# Altium PCB Portable-Charger-v1.0.PcbDoc (part 3 of 3)
Units mil, origin at the board's own origin, x right, y up, seen from the top; angles counter-clockwise.
Board outline 2795.35 x 6293 mil, 2 copper layers (Top Layer, Bottom Layer), stack 57 mil thick; 75 components, 50 nets, 273 pads, 200 vias.
Unrouted connection lines stored in the file: 2.
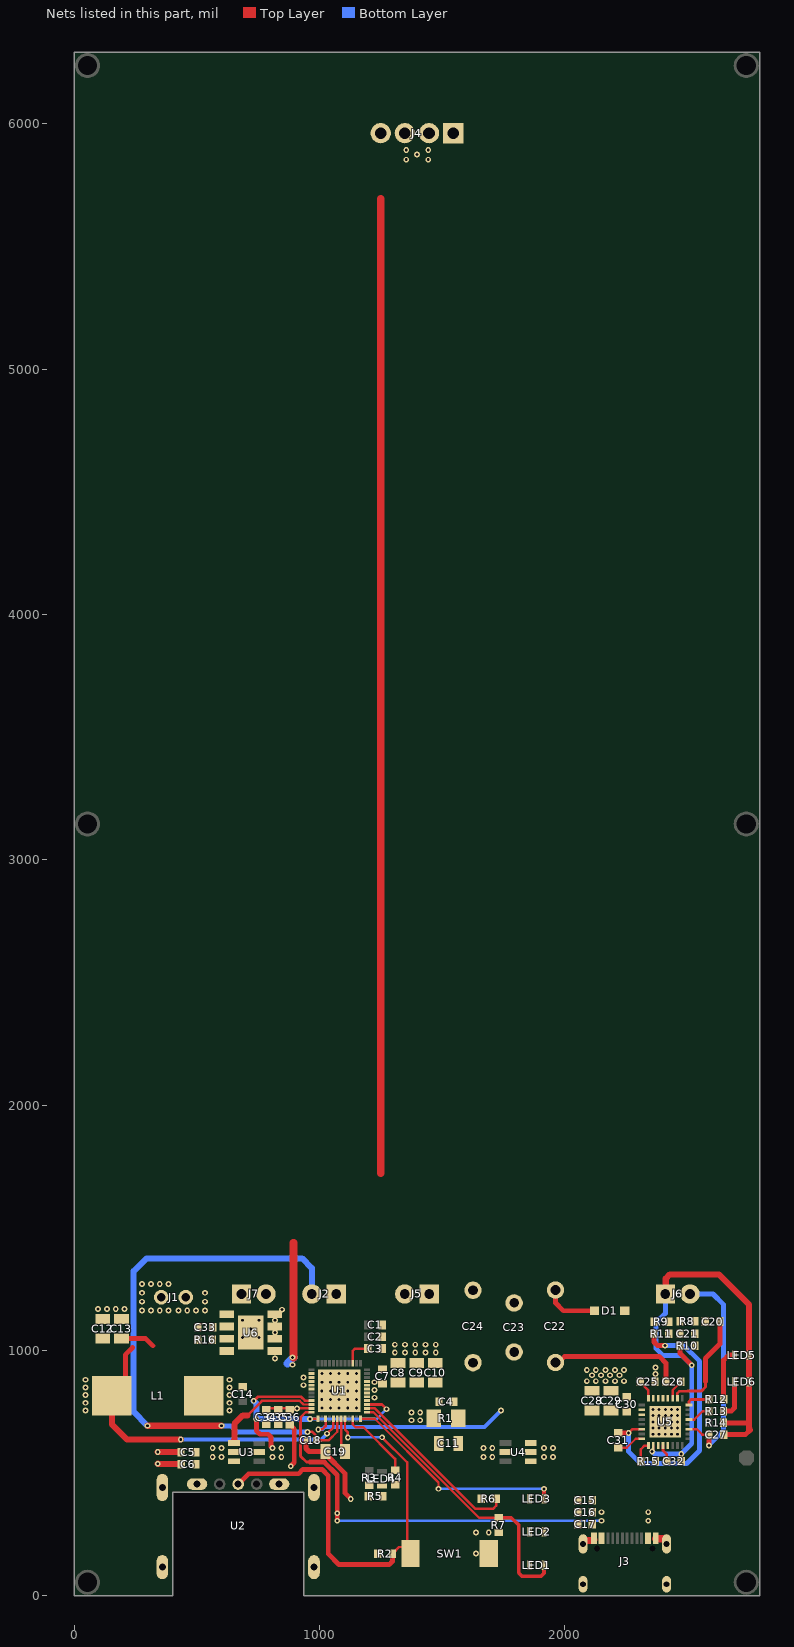
[diagram p2: the nets of this part, all layers, seen from the top]

## Via types
v1: diameter 23.62, hole 11.81, Top Layer to Bottom Layer, 200 vias

## Nets (pads, with @x,y where several pads share a name; then routed paths per layer and width w, separated by ;. In a path a pad name is that pad's centre, name@x,y a point inside that pad or via, vN(x,y) a via of type N, cw(c..) or ccw(c..) an arc to the next point about the centre after c; other vN are vias at no path point) (continued)
GND: C1.2 C2.2 C3.2 C5.1 C6.2 C7.2 C8.1 C9.1 C10.1 C11.1 C12.1 C13.1 C15.1 C16.2 C17.2 C18.1 C19.1 C21.1 C27.1 C31.1 C32.1 C34.1 C35.1 C36.1 J2.1 J3.A1/B12 J3.B1/A12 J3.S1 J3.S2 J3.S3 J3.S4 J4.2 J4.3 J6.1 LED5.2 LED6.2 R4.1 R6.2 R7.2 R10.1 R11.1 R14.1 R15.2 SW1.2 U1.49 U2.5 U2.MH1 U2.MH2 U2.MH3 U2.MH4 U5.1 U5.2 U5.32 U6.1 U6.2 U6.3 U6.4 | length 3959
  Top Layer w10: C31.1@2219,604 2219.32,603.68 2253.15,603.68 2289.57,640.1 U5.32@2313.97,640.1 ; R15.2@2310.46,560.75 2310.46,597.22 2325.78,612.54 U5.1@2341.53,612.54 ; v1(2356.57,588.44) 2356.57,592.12 2360.71,596.25 2360.71,612.03 U5.2@2361.22,612.54 ; v1(2475,578) 2475,549.23 C32.1@2475.47,548.76
  Top Layer w12: C19.1@1025,578 C19.1@1025,588
  Top Layer w20: C36.1@880,698 882.76,698 887.5,693.26 887.5,690.5 897.5,680.5 897.5,543.4 883.21,529.12 v1(883.21,528.14) ; C18.1@945.5,635 945.5,600.39 957.89,588 C19.1@1025,588 ; C19.1@1025,578 1105,498 1105,418 v1(1128,395) ; R10.1@2475,1014.68 R10.1@2470,1019.68 2470,987.96 v1(2517.93,940.03) ; R14.1@2647.43,705 2734.53,705 ; C27.1@2648.43,657 2736.42,657 2755.53,676.11
  Top Layer w25: v1(341,538.41) 342.66,536.75 C6.2@436.29,536.75 ; v1(341.01,585.75) C5.1@436.01,585.75 ; J6.1@2410.63,1230.5 2411.73,1231.6 2411.73,1292.73 2429,1310 2628.51,1310 2751.53,1186.99 LED6.2@2751.53,873 2751.53,827.47 2752,827 2752,679.64 2755.53,676.11
  Top Layer w30: J3.S4@2074.7,211.57 2074.7,222.88 2077.21,225.39 2115.81,225.39 J3.A1/B12@2118.99,228.58 ; J3.B1/A12@2371.75,233.22 2412.74,233.22 2415.25,230.71 J3.S1@2415.25,211.57
  Bottom Layer w20: v1@1009.84,835.46 v1(1009.73,835.35) v1(1009.73,800.15) 1009.84,800.04 1009.84,765.06 v1(1009.94,764.95) ; v1@1009.84,870.43 v1(1009.94,870.54) v1(1009.94,905.74) ; v1(1045.23,764.95) 1045.12,765.06 1045.12,800.04 v1(1045.01,800.15) v1(1045.01,835.35) 1045.12,835.46 1045.12,870.43 v1(1045.23,870.54) v1(1045.23,905.74) ; v1(1080.51,764.95) 1080.41,765.06 1080.41,800.04 v1(1080.3,800.15) v1(1080.3,835.35) 1080.41,835.46 1080.41,870.43 v1(1080.51,870.54) v1(1080.51,905.74) ; v1(1115.8,764.95) 1115.69,765.06 1115.69,800.04 v1(1115.58,800.15) v1(1115.58,835.35) 1115.69,835.46 1115.69,870.43 v1(1115.8,870.54) v1(1115.8,905.74) ; v1@1150.76,835.45 v1(1150.87,835.56) ; v1(1151.08,765.17) 1150.97,765.28 1150.97,800.25 v1(1150.87,800.36) v1(1150.87,835.56) ; v1(1151.08,905.95) v1(1151.08,870.76) 1150.97,870.65 1150.97,835.67 v1(1150.87,835.56) ; v1(2356.57,588.44) 2357.56,588.44 2367.99,578 v1(2475,578) 2517.93,620.93 v1(2517.93,940.03) 2477.8,980.16 2400.09,980.16 2371.42,1008.83 2371.42,1111.83 2410.63,1151.03 J6.1@2410.63,1230.5
  other v1: 1638.67,172 1638.67,257.58 1690.34,257.58 818.76,967.84 1307.6,992.25 1349.32,992.25 1391.04,992.25 1432.77,992.25 1474.49,992.25 1307.6,1023.74 1349.32,1023.74 1391.04,1023.74 1432.77,1023.74 1474.49,1023.74 818.76,1072.84 818.76,1123.39 847.23,1166.39 98,1169 134,1169 170,1169 206,1169 1354.3,5854.39 1443.88,5854.39 1397.88,5875.39 1354.3,5893.39 1443.88,5893.39
GSET: R2.2 SW1.1 U1.20 U2.3 | length 1816
  Top Layer w10: U1.20@1104.43,721.69 1104.43,677.52 1115.93,666.03 v1(1115.93,645.71) ; v1(1256,646) 1357.81,544.19 1357.81,222.12 1353.27,217.58 1343.58,217.58 1343.58,203.44 1339.04,198.9 1324.9,198.9 1310.5,184.5 1308,184.5 1298,174.5 R2.2@1298,172
  Top Layer w20: U2.3@668.99,455.29 711.35,497.65 915.51,497.65 933,515.14 1010.84,515.14 1036,489.98 1036,170.96 1079.96,127 1284.75,127 1298,140.25 R2.2@1298,172
  Bottom Layer w10: v1(1115.93,645.71) 1116.07,645.86 1255.86,645.86 v1(1256,646)
LED1/SCK: LED1.2 LED2.1 LED3.2 R6.1 U1.26 | length 730.3
  Top Layer w10: U1.26@1194,764.01 1225.99,764.01 1636,354 1707.22,354 1720.34,367.12 R6.1@1720.34,395.78
LED2/SDA: LED1.1 LED2.2 R7.1 U1.25 | length 1150.3
  Top Layer w10: U1.25@1194,748.26 1220.52,748.26 1650.69,318.09 R7.1@1731.99,318.09
  Top Layer w15: R7.1@1731.99,318.09 1782.66,318.09 1812.26,288.48 1812.26,93.34 1826.07,79.52 1903.52,79.52 1915.53,91.53 LED1.1@1915.53,124
LED3: LED3.1 U1.24 | length 925.7
  Top Layer w10: U1.24@1167.43,721.69 1225.88,721.69 1485.67,461.9 v1(1485.67,436.12)
  Top Layer w15: LED3.1@1915.53,395.78 1915.53,435.83 v1@1918.48,438.78
  Bottom Layer w10: v1(1485.67,436.12) v1(1915.48,436.12)
LED5/CSET: R4.2 U1.22 | length 300.2
  Top Layer w10: U1.22@1135.93,721.69 1135.93,698.93 1147.69,687.16 1179.84,687.16 1309,558 R4.2@1309,512
NetC3_1: C3.1 U1.39 | length 115.1
  Top Layer w10: U1.39@1135.93,948.06 1135.93,998.02 1145.78,1007.87 C3.1@1197,1007.87
NetC14_1: C14.1 L1.2 U1.2 U1.3 U1.4 U1.5 U1.6
  other v1: 634,755.11 634,786.55 634,818 634,849.45 935,858.55 634,880.89 935,890
NetC20_1: C20.1 C21.2 R8.1 R10.2
NetC22_1: C22.1 C23.1 C24.1 D1.1 J5.2 | length 224.1
  Top Layer w20: C22.1@1962.43,1246.27 1962.6,1246.11 1962.6,1193.91 1994.5,1162 D1.1@2120.99,1162
NetC22_2: C22.2 C23.2 C24.2 C26.2 U5.20 U5.21 | length 547.3
  Top Layer w20: C22.2@1962.43,951 1974.82,951 1999.58,975.75 2385.61,975.75 2412.43,948.93 C26.2@2412.43,873
NetC25_1: C25.1 U5.24 | length 81.3
  Top Layer w10: C25.1@2308.43,873 2308.43,870.5 2341.53,837.4 U5.24@2341.53,805.46
NetC25_2: C25.2 J5.1 U5.22 U5.23
  other v1: 2369.92,904.01 2369.92,930.51
NetC26_1: C26.1 U5.19 | length 81
  Top Layer w10: U5.19@2439.96,805.46 2439.96,838.03 2472.43,870.5 C26.1@2472.43,873
NetC32_2: C32.2 U5.4 | length 69.9
  Top Layer w11: U5.4@2400.59,612.54 2400.6,592.4 2415.47,577.53 C32.2@2415.47,548.76
NetC33_1: C33.1 J1.2 J7.2 U6.5 U6.7 U6.8 U6.9
  other v1: 686.88,1052.51 754.44,1052.51 720.44,1087.05 686.88,1123.39 754.44,1123.39 425.43,1163 461.43,1163 497.43,1163 533.43,1163 533.43,1199 533.43,1235
NetC33_2: C33.2 R16.2 U6.6
NetD1_2: D1.2 R8.2 R9.2
NetLED4_1: LED4.1 R5.2
NetLED5_1: LED5.1 R12.2 | length 209.2
  Top Layer w20: R12.2@2647.86,800.99 2647.86,960.76 2667.99,980.89 LED5.1@2689,980.89
NetLED6_1: LED6.1 R13.2 | length 157.4
  Top Layer w20: R13.2@2647.43,753 2679.44,752.99 2692.47,766.02 LED6.1@2692.47,873
NetR12_1: R12.1 U5.16 | length 98.6
  Top Layer w12: U5.16@2506.89,777.9 2506.89,791.68 2516.19,800.99 R12.1@2587.86,800.99
NetR13_1: R13.1 U5.13 | length 94.5
  Top Layer w10: U5.13@2507.2,718.52 2528.21,718.52 2562.69,753 R13.1@2587.43,753
NTC1: C18.2 J2.2 U1.18 | length 2403.6
  Top Layer w10: v1(951,668) 971.33,668 982.5,656.83 C18.2@982.5,635 982.61,634.89 1039.25,634.89 1072.94,668.58 U1.18@1072.94,721.69
  Top Layer w25: v1(299,693) v1(601,693)
  Bottom Layer w20: v1@599.35,693 638.82,693 663.89,667.93 950.93,667.93 v1(951,668)
  Bottom Layer w25: v1(299,693) 242.43,749.57 242.43,1322.77 295.37,1375.72 929.71,1375.72 969.43,1336 J2.2@969.43,1230.5
NTC2: C27.2 J6.2 U5.11 | length 888.4
  Top Layer w10: U5.11@2506.89,679.47 2538.23,679.47 2560.7,657 C27.2@2588.43,657
  Top Layer w20: v1(2587.92,613.04) 2587.92,656.5 C27.2@2588.43,657
  Bottom Layer w20: J6.2@2510.63,1230.5 2604.5,1230.5 2647,1188 2647,672.12 v1(2587.92,613.04)
PGND: C28.1 C29.1 C30.2 R15.1 U5.3 U5.5 U5.33
  other v1: 2359.61,658.58 2384.8,658.58 2410,658.58 2435.19,658.58 2460.39,658.58 2359.61,683.83 2384.8,683.83 2410,683.83 2435.19,683.83 2460.39,683.83 2359.61,709.08 2384.8,709.08 2410,709.08 2435.19,709.08 2460.39,709.08 2359.82,734.33 2385.02,734.33 2410.21,734.33 2435.41,734.33 2460.61,734.33 2359.82,759.58 2385.02,759.58 2410.21,759.58 2435.41,759.58 2460.61,759.58 2090.25,875 2127,875 2166.38,875 2205.38,874.99 2241.38,874.99 2110.86,899.23 2147.61,899.23 2184.37,899.23 2223.88,899.23 2090.25,920.56 2127,920.56 2166.38,920.56 2205.38,920.56 2241.38,920.56
V_DECODE: C20.2 U5.18 | length 436.5
  Top Layer w10: U5.18@2459.64,805.46 2459.64,826 2467.64,834 2500,834
  Top Layer w12: 2500,834 2556.43,834 2573.76,851.33 2573.76,873.01
  Top Layer w20: 2573.76,873.01 2573.76,967.56 2633.17,1026.97 C20.2@2633.17,1118.03
V_DET: C31.2 R9.1 R11.2 U5.30 | length 1125
  Top Layer w10: C31.2@2219,664 C31.2@2219.32,663.68 ; v1(2260.91,663.68) 2276.71,679.47 U5.30@2313.97,679.47
  Top Layer w20: C31.2@2219.32,663.68 v1(2260.91,663.68) ; R11.2@2363.92,1068.06 2363.92,1034.68 2378.92,1019.68 v1(2408.92,1019.68)
  Bottom Layer w20: v1(2260.91,663.68) 2260.91,587.61 2309.68,538.84 2496.53,538.84 2550.1,592.42 2550.1,955.97 2486.4,1019.68 v1(2408.92,1019.68)
VBAT: C12.2 C13.2 J1.1 J7.1 L1.1 R16.1 U1.17 | length 1383.4
  Top Layer w10: v1(1031.58,660.9) 1057.19,686.51 U1.17@1057.19,721.69
  Top Layer w20: C13.2@193,1048.57 291.86,1048.57 321,1019.43 ; L1.1@209,881.9 209,982.54 238.24,1011.79
  Top Layer w25: L1.1@153.99,816 153.99,699.01 215.73,637.27 v1(435,637.27)
  Bottom Layer w15: v1(435,637.27) 1007.95,637.27 v1(1031.58,660.9)
  other v1: 47,755.11 47,786.55 47,818 47,849.45 47,880.89 277.43,1163 313.43,1163 349.43,1163 385.43,1163 277.43,1199 277.43,1235 277.43,1271 313.43,1271 349.43,1271 385.43,1271
VBUSA1: C5.2 C6.1 U1.10 U2.1 U3.1 U3.3 | length 438.8
  Top Layer w10: U3.1@651.82,623.29 651.82,637.27 ; 706.54,735.08 766.02,794.56 920.2,794.56 935,779.76 U1.10@967.62,779.76
  Top Layer w25: 651.82,635.51 653.67,637.35 653.67,700.46 688.29,735.08 706.54,735.08
VBUSA2: C28.2 C29.2 C30.1 U1.15 U5.26 U5.27 | length 845.3
  Top Layer w10: v1(995.26,678.14) 995.83,678.71 1012.61,678.71 1025.65,691.74 1025.65,721.64 U1.15@1025.69,721.69
  Top Layer w20: v1(1740,755) v1@1740.5,755.5 ; C28.2@2099.12,755.5 2099.62,755 C28.2@2100.62,756
  Bottom Layer w15: v1@995,679 995.79,679.79 1013.26,679.79 1021.36,687.89 1672.89,687.89 v1(1740,755)
VBUSB: C34.2 C35.2 C36.2 J4.1 J4.4 U1.11 | length 4664.2
  Top Layer w11: C34.2@784,758.26 789.75,764.01 875.49,764.01 C36.2@880.01,759.49 ; C36.2@880,758 883.59,761.59 906.36,761.59 v1(908.78,764.01) U1.11@967.62,764.01
  Top Layer w31.5: v1@894.95,971.2 894.95,1439 ; 1250,1722 1250,5694
  Bottom Layer w31.5: 870.14,947.13 v1@894.2,971.2
  other v1: 890.95,942.06 890.95,972.2
VBUSC: C15.2 C16.1 C17.1 J3.A4/B9 J3.B4/A9 U1.12 U4.1 U4.3 | length 1648.4
  Top Layer w10: 922.94,727.3 943.89,748.26 U1.12@967.62,748.26
  Top Layer w12: 922.94,727.3 922.94,569.23 947.17,545 960.81,545
  Top Layer w20: 960.81,545 1020.48,545 1073,492.48 v1(1073,306)
  Bottom Layer w12: v1@1082,306 2150.24,306 v1@2150.49,305.75
  other v1: 2149.49,305.75 2340.47,305.75 1073,336.53 2149.49,340.87 2340.47,340.87
VCC: C19.2 R2.1 R3.1 R5.1 U1.19 | length 140.4
  Top Layer w10: U1.19@1088.68,721.69 1088.68,614.32 1105,598 C19.2@1105,588
VOUTA1: C4.2 C11.2 R1.2 U1.9 U1.13 U1.27 U3.2 U3.5 U4.2 U4.5 | length 1159.9
  Top Layer w11: v1(732.59,794.81) 749.13,811.35 925.47,811.35 941.31,795.5 U1.9@967.62,795.5 ; v1(962,721) 962.34,721.34 993.85,721.34 U1.13@994.2,721.69 ; U1.27@1194,779.76 1255.21,779.76 v1(1274.18,760.79)
  Top Layer w20: v1(743,720) 743,673.54 757.93,658.61 791.09,658.61 802.81,646.89 802.81,609.01 v1(808.82,603)
  Bottom Layer w11: v1(962,721) 962.11,720.89 1234.28,720.89 v1(1274.18,760.79)
  Bottom Layer w25: v1(732.59,794.81) 743,784.4 v1(743,720) 961,720 v1(962,721)
  other v1: 565,566 601,566 808.82,566 844.82,566 1669,566 1705,566 1915.85,566 1951.85,566 565,603 601,603 844.82,603 1669,603 1705,603 1915.85,603 1951.85,603
VOUTSN: C4.1 C7.1 C8.2 C9.2 C10.2 R1.1 U1.28 U1.29 U1.30 U1.31 U1.32 U1.33
  other v1: 1376,715.55 1410.96,715.55 1376,747 1410.96,747 1224.88,807.66 1224.88,839.11 1224.88,870.55
pads on no net: J3.A8 J3.B8 J3.MH U1.8 U1.14 U1.16 U1.23 U1.34 U1.35 U1.37 U1.44 U1.45 U5.6 U5.7 U5.8 U5.9 U5.14 U5.15 U5.17 U5.25 U5.31

## Polygon pours and split planes (outlines as drawn)
GND on Bottom Layer "NONET_L02_P-001" (solid, remove dead copper, pour order 0): 386.39,21.61 20,21.61 20,6260.6 2770,6260.6 2770,21.61 960,21.61 960,38.4 960,434.13 390.56,434.13 386.39,434.13 386.39,429.96
GND on Top Layer "NONET_L02_P-001" (solid, remove dead copper, pour order 1): 20,21.61 20,6261.6 2770,6261.6 2770,21.61 960,21.61 960,434.13 386.39,434.13 386.39,21.61

## Other copper
Top Layer:
  rectangle net GND: 766.5,683.26 897.5,713
  rectangle net VBUSB: 766.5,743 897.5,773.26
  region net VBUSB: 1636.19,6037.08 1498.77,6037.08 1498.77,5702.42 1636.19,5702.42
  rectangle net VBUSB: 1128,5702.42 1636.19,5810
  rectangle net GND: 1306.62,5824.27 1488.68,6037.65
  rectangle net VBUSB: 1128,1421 1295.3,6038.13
  rectangle net NetD1_2: 2226.31,1144.28 2484.62,1179.72
  rectangle net VBUSB: 868.02,921.49 921,1452.35
  rectangle net VBUSB: 868.02,1421 1295.3,1560
  rectangle net GND: 2632.43,639.5 2766.43,722.5
  rectangle net GATEC: 1734.84,617.09 1782.87,641.5
  rectangle net VCC: 1082.84,558 1158.84,618
  rectangle net GND: 75,1109 230,1192
  rectangle net NetC33_1: 591.93,964.47 772,1046.04
  rectangle net VBUSA2: 1723,732 2203,776
  rectangle net VBUSA1: 466.3,628.8 675.83,659.92
  rectangle net VBUSC: 1824.47,508.86 1886.02,560.69
  rectangle net DC_N: 2209.55,183.25 2260.73,200.51
  rectangle net DC_N: 2248.92,183.25 2260.73,257.63
  rectangle net DC_N: 2209.55,183.25 2221.36,257.63
  region net DC_P: 2280.41,284.76 2268.6,284.76 2268.6,210.39 2280.41,210.39
  region net DC_P: 2241.04,284.76 2229.23,284.76 2229.23,210.39 2241.04,210.39
  region net DC_P: 2280.41,284.76 2229.23,284.76 2229.23,267.5 2280.41,267.5
  rectangle net PGND: 2346.37,644.95 2474.48,773.06
  rectangle net GND: 789.14,950 848.39,1163.63
  rectangle net GND: 2455,1002.18 2485,1086.5
  rectangle net GND: 2408.92,1050.56 2485,1086.5
  rectangle net GND: 1253.06,909.1 1294.83,1121.5
  rectangle net GND: 1239.98,909.1 1274.98,939.1
  rectangle net GND: 1257.48,908.87 1502.48,1047.84
  rectangle net GND: 1242,990.5 1294.83,1121.5
  rectangle net LED1/SCK: 1705.34,378.28 1866.31,415.47
  rectangle net LED2/SDA: 1905.69,104.31 1925.37,280.47
  rectangle net LED1/SCK: 1846.63,104.31 1866.31,415.47
  rectangle net NetC20_1: 2514.5,1097.68 2588.17,1136.18
  rectangle net NetD1_2: 2409,1100.68 2484.62,1179.72
  rectangle net PGND: 2355.46,531.25 2386.41,566.25
  rectangle net PGND: 2375.39,531.25 2386.41,773.06
  rectangle net PGND: 2414.76,598.76 2425.78,773.06
  rectangle net NetC33_1: 592.48,982.05 771.87,1063.63
  rectangle net VBAT: 73.61,965 519,1068.57
  rectangle net VBAT: 242.43,1026.53 519,1061.53
  rectangle net NetC33_1: 732.88,1003.9 771.87,1294
  rectangle net NetC33_1: 669,982.05 771.87,1163.63
  rectangle net NetC33_2: 549.03,1082.05 651.74,1113.63
  rectangle net NetC33_1: 732.88,1186.27 844,1294
  rectangle net NetC33_1: 415,1132.05 564.51,1258
  rectangle net NetC33_1: 415.5,1132.05 771.87,1163.63
  rectangle net NetC33_2: 549,1024.43 580,1111.53
  rectangle net VCC: 1129,430 1220.07,465.47
  rectangle net VCC: 1129,431 1163,618
  rectangle net VOUTSN: 1181.2,790 1438.48,880.15
  rectangle net VCC: 1173.14,154.5 1220.07,465.47
  rectangle net PGND: 2073.62,796 2272.99,940.29
  rectangle net VBUSC: 2090.13,264.36 2162.3,531.84
  rectangle net VBUSC: 2325.57,265.04 2354.27,358
  rectangle net VBUSC: 2327.66,210.39 2351.28,358
  rectangle net V_DET: 2348.5,1050.56 2378.92,1135.24
  rectangle net NetC22_1: 1297.64,1281.07 2010,1384
  region net NetC22_1: 1395.64,1383 1297.64,1383 1297.64,1180.5 1395.64,1180.5
  rectangle net NetC22_2: 1582,903 2010,1043.75
  rectangle net NetC25_2: 2353.43,855.5 2386.41,948
  rectangle net NetC22_2: 2395.08,855.5 2427.43,891.02
  rectangle net NetC25_2: 2355.71,791.68 2386.41,891
  rectangle net NetC22_2: 2395.08,791.68 2425.78,891.02
  rectangle net NetC26_1: 2457.43,855.5 2487.43,890.5
  rectangle net NetC20_1: 2514.5,1002.18 2549.5,1136.18
  rectangle net NetC22_1: 1529,1140 2143,1384
  rectangle net VOUTA1: 1532.48,548 1595.9,809.37
  rectangle net GSET: 1283,116.88 1408.84,228
  rectangle net VBAT: 241.67,978 402.88,1405
  rectangle net VBUSA2: 2066.62,733.02 2262.5,776
  rectangle net VBUSA2: 2229,733.02 2327.75,763.72
  rectangle net BSET: 1185.07,495.47 1274.69,525.47
  rectangle net VBUSC: 2138.43,210.39 2162.3,405.5
  rectangle net VBUSC: 1983,461 2049,662.92
  rectangle net VBUSC: 1837.99,508.86 1886.02,560.69
  region net VBUSC: 2162.3,539.98 1824.47,539.98 1824.47,461 2162.3,461
  rectangle net VBUSC: 1837.99,611.09 1886.02,662.92
  region net VBUSC: 2049,662.92 1837.99,662.92 1837.99,631.8 2049,631.8
  rectangle net VBUSA1: 453.79,429.84 549.09,488.5
  region net VBUSA1: 675.83,659.92 627.8,659.92 627.8,611.09 675.83,611.09
  rectangle net VBUSA1: 466.3,508.86 675.83,539.98
  rectangle net VBUSA1: 627.8,508.86 675.83,560.69
  rectangle net VOUTA1: 549.89,573.69 675.83,598.1
  rectangle net VOUTA1: 549.89,548 617.39,620.84
  rectangle net VOUTA1: 792.81,548 868.89,646.12
  rectangle net VOUTA1: 730.95,573.69 868.89,598.1
  rectangle net VOUTA1: 1896.43,547.89 1973,620.84
  region net VOUTA1: 1973,598.1 1837.99,598.1 1837.99,573.69 1973,573.69
  rectangle net VOUTA1: 1647,573.69 1782.87,598.1
  rectangle net VOUTA1: 1536.48,548 1723,620.84
  rectangle net NetC14_1: 447.3,836.84 980.42,911.65
  rectangle net NetLED4_1: 1243.57,387.97 1273.57,457.32
  rectangle net GSET: 1334.04,116.88 1408.84,227.12
  rectangle net VCC: 1173.14,154.5 1253,189.5
  rectangle net VOUTSN: 1357.81,688.87 1502.48,758.87
  rectangle net VOUTSN: 1357.81,688.87 1451.35,811.25
  rectangle net VOUTSN: 1435.9,688.87 1502.48,888.87
  rectangle net VOUTSN: 1277.95,805.35 1502.48,888.87
  rectangle net VBUSA1: 466.3,429.83 541,660
  rectangle net NetC14_1: 447.3,735.29 661.83,911.65
  rectangle net NetC33_1: 415,1076.5 520,1258
  rectangle net VBAT: 25,733.51 234.7,1068.57
  rectangle net VBAT: 241.67,1267 721.65,1405
  rectangle net VBAT: 585.57,1186.64 721.65,1405
Bottom Layer:
  rectangle net VBUSB: 849,736.83 931.62,782.29
  rectangle net VBAT: 266.88,1147 405.43,1283
  rectangle net VBAT: 19,736 83,912
  rectangle net NetC14_1: 920.5,835.46 959,910.54
  rectangle net NetC14_1: 604,736 661.83,912
  rectangle net VOUTSN: 1194,790 1239,882
  region net VBUSB: 912,989.63 849,989.63 849,736.83 912,736.83
  rectangle net GND: 1314.1,976 1490,1040
  rectangle net GND: 992,747 1166,919
  rectangle net PGND: 2110.39,732 2474.48,823.47
  rectangle net PGND: 2071.44,732 2262.5,940.29
  rectangle net NetC25_2: 2272.99,891.39 2349,1384
  rectangle net NetC25_2: 2288.31,891.39 2386.41,948
  rectangle net NetC33_1: 742.25,1039.53 778,1280.5
  rectangle net NetC33_1: 669,1039.53 771.87,1163.63
  rectangle net NetC33_1: 742.25,1180.5 830.28,1328
  rectangle net NetC33_1: 414.04,1280.5 830.28,1337.77
  rectangle net NetC33_1: 414.04,1147 553.43,1337.77
  rectangle net VBUSC: 1058,291.86 2354.27,358
  rectangle net PGND: 2346.37,644.95 2474.48,823.47
  rectangle net NetC25_2: 1408.27,1302 2349,1384
  rectangle net NetC25_2: 1408.27,1191.13 1517,1384
  rectangle net VOUTA1: 549.89,548 1973,620.84

## Silkscreen, mask and mechanical layers (free items; w line width, h text height)
Top Overlay:
  lines w10: 436,1062 463,1062 478,1077 ; 579,1015 579,974 585,968 ; 2249.13,1111.11 2337,1111.11 ; 2525,1148 2540,1163 2567,1163 ; 2550.13,1069.28 2559,1069.28 ; 118.58,1384 2677.63,1384 2677.63,5832.82 118.58,5832.82 118.58,1384
  text "PLACE BATTERY HERE" at 1728.26,1850.38 h300 r90
  text "BATTERY CONNECTOR" at 234,1285.03 h60
  text "NTC" at 917,1284 h60
  text "COIL" at 1296,1284 h60
  text "NTC" at 2357,1284 h60
  text "+" at 582.11,1212.54 h50
  text "-" at 881.89,1212.1 h50
  text "+" at 331.54,1087.67 h50
  text "-" at 479.32,1087.67 h50
  text "DEBUG" at 2577,475 h60
  text "USB TYPE-A" at 1084.57,4.62 h70 r90
  text "USB TYPE-C" at 2526.43,4.62 h80 r90
Bottom Overlay:
  drawing of 6172 lines, arcs and shapes, not listed
  text "ZERO CARBON FOOTPRINT" at 1842.5,4936 h38
  text "LED status when battery is being charged" at 2504.5,4459.14 h100
  text "LED3" at 682.5,4285.98 h100
  text "LED2" at 1174.5,4285.98 h100
  text "LED1" at 1657.5,4285.98 h100
  text "CAPACITY" at 2395.01,4285.98 h100
  text "ON" at 599.43,4101.75 h100
  text "ON" at 1082.43,4101.75 h100
  text "ON" at 1565.43,4101.75 h100
  text "100%" at 2395.01,4101.75 h100
  text "FLICKER" at 717.54,3904.9 h100
  text "ON" at 1082.43,3904.9 h100
  text "ON" at 1565.43,3904.9 h100
  text "66~99%" at 2395.01,3904.9 h100
  text "OFF" at 599.43,3708.05 h100
  text "FLICKER" at 1200.54,3708.05 h100
  text "ON" at 1565.43,3708.05 h100
  text "33~66%" at 2395.01,3708.05 h100
  text "OFF" at 599.43,3511.2 h100
  text "OFF" at 1082.43,3511.2 h100
  text "FLICKER" at 1683.54,3511.2 h100
  text "0~33%" at 2395.01,3511.2 h100
  text "LED status when battery is being discharged" at 2504.5,2817.14 h100
  text "LED3" at 682.5,2644 h100
  text "LED2" at 1174.5,2644 h100
  text "LED1" at 1657.5,2644 h100
  text "CAPACITY" at 2395.01,2644 h100
  text "ON" at 599.43,2459.77 h100
  text "ON" at 1082.43,2459.77 h100
  text "ON" at 1565.43,2459.77 h100
  text "66~100%" at 2395.01,2459.77 h100
  text "OFF" at 599.43,2262.92 h100
  text "ON" at 1082.43,2262.92 h100
  text "ON" at 1565.43,2262.92 h100
  text "33~66%" at 2395.01,2262.92 h100
  text "OFF" at 599.43,2066.07 h100
  text "OFF" at 1082.43,2066.07 h100
  text "ON" at 1565.43,2066.07 h100
  text "5~33%" at 2395.01,2066.07 h100
  text "OFF" at 599.43,1869.22 h100
  text "OFF" at 1082.43,1869.22 h100
  text "FLICKER" at 1683.54,1869.22 h100
  text "1~5%" at 2395.01,1869.22 h100
  text "0%" at 2395.01,1672.37 h100
  text "OFF" at 600.91,1664.4 h100
  text "OFF" at 1083.91,1664.4 h100
  text "OFF" at 1566.91,1664.4 h100
  text "ZERO CARBON FOOTPRINT" at 1888.9,408.49 h38
Board Outline:
  lines w10: 936.71,0 936.71,422.67 401.28,422.67 401.28,0 0,0 0,6293 2795.35,6293 2795.35,0 936.71,0 ; 936.71,0 936.71,0
Fabrication:
  drawing of 451 lines, arcs and shapes, not listed
  text "Layer" at 3116.51,6314.1 h60
  text "Name" at 3526.43,6314.1 h60
  text "Material" at 4456.17,6314.1 h60
  text "Thickness" at 5315.94,6314.1 h60
  text "Constant" at 5965.77,6314.1 h60
  text "Board Layer Stack" at 6535.64,6314.1 h60
  text "Top Overlay" at 3526.43,6194.1 h60
  text "Top Solder" at 3526.43,6074.1 h60
  text "Solder Resist" at 4456.17,6074.1 h60
  text "3.00mil" at 5315.94,6074.1 h60
  text "3.5" at 5965.77,6074.1 h60
  text "1" at 3116.51,5954.1 h60
  text "Top Layer" at 3526.43,5954.1 h60
  text "10.00mil" at 5315.94,5954.1 h60
  text "Dielectric 1" at 3526.43,5834.1 h60
  text "FR-4" at 4456.17,5834.1 h60
  text "37.00mil" at 5315.94,5834.1 h60
  text "4.8" at 5965.77,5834.1 h60
  text "2" at 3116.51,5714.1 h60
  text "Bottom Layer" at 3526.43,5714.1 h60
  text "10.00mil" at 5315.94,5714.1 h60
  text "Bottom Solder" at 3526.43,5594.1 h60
  text "Solder Resist" at 4456.17,5594.1 h60
  text "3.00mil" at 5315.94,5594.1 h60
  text "3.5" at 5965.77,5594.1 h60
  text "Bottom Overlay" at 3526.43,5474.1 h60
  text "Total board thickness:" at 3116.51,5354.1 h60
  text "63.00mil" at 5315.94,5354.1 h60
Drill Drawing:
  circle w10: c155.85,7882.33 r33.33
  circle w10: c155.85,7132.33 r20
  circle w10: c155.85,7132.33 r33.33
  lines w10: 122.52,7265.67 139.19,7265.67 155.85,7249 172.52,7265.67 189.19,7265.67 172.52,7282.33 189.19,7299 172.52,7299 155.85,7315.67 139.19,7299 122.52,7299 139.19,7282.33 122.52,7265.67 ; 122.52,7399 189.19,7399 189.19,7465.67 122.52,7465.67 122.52,7399 ; 122.52,7565.67 139.19,7565.67 139.19,7549 172.52,7549 172.52,7565.67 189.19,7565.67 189.19,7599 172.52,7599 172.52,7615.67 139.19,7615.67 139.19,7599 122.52,7599 122.52,7565.67 ; 122.52,7765.67 189.19,7765.67 155.85,7699 122.52,7765.67 ; 122.52,8015.67 139.19,8015.67 155.85,7999 172.52,8015.67 189.19,8015.67 172.52,8032.33 189.19,8049 172.52,8049 155.85,8065.67 139.19,8049 122.52,8049 139.19,8032.33 122.52,8015.67 ; 122.52,8149 155.85,8165.67 189.19,8149 172.52,8182.33 189.19,8215.67 155.85,8199 122.52,8215.67 139.19,8182.33 122.52,8149 ; 122.52,8299 122.52,8315.67 139.19,8332.33 122.52,8349 122.52,8365.67 139.19,8365.67 155.85,8349 172.52,8365.67 189.19,8365.67 189.19,8349 172.52,8332.33 189.19,8315.67 189.19,8299 172.52,8299 155.85,8315.67 139.19,8299 122.52,8299 ; 122.52,8482.33 155.85,8449 189.19,8482.33 155.85,8515.67 122.52,8482.33 ; 122.52,8599 189.19,8599 189.19,8665.67 122.52,8665.67 122.52,8599 ; 122.52,8815.67 189.19,8815.67 155.85,8749 122.52,8815.67 ; 135.85,7272.33 145.85,7272.33 155.85,7262.33 165.85,7272.33 175.85,7272.33 165.85,7282.33 175.85,7292.33 165.85,7292.33 155.85,7302.33 145.85,7292.33 135.85,7292.33 145.85,7282.33 135.85,7272.33 ; 135.85,8612.33 175.85,8612.33 175.85,8652.33 135.85,8652.33 135.85,8612.33 ; 135.85,8802.33 175.85,8802.33 155.85,8762.33 135.85,8802.33
  lines w15: 62.73,7054 7632.65,7054 ; 62.73,8854 7632.65,8854 ; 613.6,6904 613.6,9004 ; 1203.45,6904 1203.45,9004 ; 2303.13,6904 2303.13,9004 ; 2809,6904 2809,9004 ; 3542.81,6904 3542.81,9004 ; 5042.36,6904 5042.36,9004 ; 5632.2,6904 5632.2,9004 ; 6378,6904 6378,9004 ; 62.73,6904 7632.65,6904 7632.65,9004 62.73,9004 62.73,6904
  text "Symbol" at 152.73,8899 h72
  text "Count" at 658.6,8899 h72
  text "Hole Size" at 1248.45,8899 h72
  text "Plated" at 2348.13,8899 h72
  text "Hole Type" at 2854,8899 h72
  text "Drill Layer Pair" at 3587.81,8899 h72
  text "Via/Pad" at 5087.36,8899 h72
  text "Pad Shape" at 5677.2,8899 h72
  text "Template" at 6423,8899 h72
  text "200" at 658.6,8749 h60
  text "11.81mil (0.300mm)" at 1248.45,8749 h60
  text "PTH" at 2348.13,8749 h60
  text "Round" at 2854,8749 h60
  text "Top Layer - Bottom Layer" at 3587.81,8749 h60
  text "Via" at 5087.36,8749 h60
  text "Rounded" at 5677.2,8749 h60
  text "v60h30" at 6423,8749 h60
  text "2" at 658.6,8599 h60
  text "23.62mil (0.600mm)" at 1248.45,8599 h60
  text "PTH" at 2348.13,8599 h60
  text "Slot" at 2854,8599 h60
  text "Top Layer - Bottom Layer" at 3587.81,8599 h60
  text "Pad" at 5087.36,8599 h60
  text "Rounded" at 5677.2,8599 h60
  text "r90_170h60_140r100" at 6423,8599 h60
  text "2" at 658.6,8449 h60
  text "23.62mil (0.600mm)" at 1248.45,8449 h60
  text "PTH" at 2348.13,8449 h60
  text "Slot" at 2854,8449 h60
  text "Top Layer - Bottom Layer" at 3587.81,8449 h60
  text "Pad" at 5087.36,8449 h60
  text "Rounded" at 5677.2,8449 h60
  text "(Mixed)" at 6423,8449 h60
  text "2" at 658.6,8299 h60
  text "24.41mil (0.620mm)" at 1248.45,8299 h60
  text "NPTH" at 2348.13,8299 h60
  text "Round" at 2854,8299 h60
  text "Top Layer - Bottom Layer" at 3587.81,8299 h60
  text "Pad" at 5087.36,8299 h60
  text "Rounded" at 5677.2,8299 h60
  text "c0hn62" at 6423,8299 h60
  text "3" at 658.6,8149 h60
  text "28.35mil (0.720mm)" at 1248.45,8149 h60
  text "PTH" at 2348.13,8149 h60
  text "Round" at 2854,8149 h60
  text "Top Layer - Bottom Layer" at 3587.81,8149 h60
  text "Pad" at 5087.36,8149 h60
  text "Rounded" at 5677.2,8149 h60
  text "c120h72" at 6423,8149 h60
  text "2" at 658.6,7999 h60
  text "28.35mil (0.720mm)" at 1248.45,7999 h60
  text "PTH" at 2348.13,7999 h60
  text "Slot" at 2854,7999 h60
  text "Top Layer - Bottom Layer" at 3587.81,7999 h60
  text "Pad" at 5087.36,7999 h60
  text "Rounded" at 5677.2,7999 h60
  text "(Mixed)" at 6423,7999 h60
  text "2" at 658.6,7849 h60
  text "28.35mil (0.720mm)" at 1248.45,7849 h60
  text "PTH" at 2348.13,7849 h60
  text "Slot" at 2854,7849 h60
  text "Top Layer - Bottom Layer" at 3587.81,7849 h60
  text "Pad" at 5087.36,7849 h60
  text "Rounded" at 5677.2,7849 h60
  text "r120_250h72_190r100" at 6423,7849 h60
  text "2" at 658.6,7699 h60
  text "28.35mil (0.720mm)" at 1248.45,7699 h60
  text "PTH" at 2348.13,7699 h60
  text "Slot" at 2854,7699 h60
  text "Top Layer - Bottom Layer" at 3587.81,7699 h60
  text "Pad" at 5087.36,7699 h60
  text "Rounded" at 5677.2,7699 h60
  text "r120_280h72_220r100" at 6423,7699 h60
  text "2" at 658.6,7549 h60
  text "35.43mil (0.900mm)" at 1248.45,7549 h60
  text "PTH" at 2348.13,7549 h60
  text "Round" at 2854,7549 h60
  text "Top Layer - Bottom Layer" at 3587.81,7549 h60
  text "Pad" at 5087.36,7549 h60
  text "Rounded" at 5677.2,7549 h60
  text "c152h90" at 6423,7549 h60
  text "14" at 658.6,7399 h60
  text "39.37mil (1.000mm)" at 1248.45,7399 h60
  text "PTH" at 2348.13,7399 h60
  text "Round" at 2854,7399 h60
  text "Top Layer - Bottom Layer" at 3587.81,7399 h60
  text "Pad" at 5087.36,7399 h60
  text "(Mixed)" at 5677.2,7399 h60
  text "(Mixed)" at 6423,7399 h60
  text "4" at 658.6,7249 h60
  text "47.24mil (1.200mm)" at 1248.45,7249 h60
  text "PTH" at 2348.13,7249 h60
  text "Round" at 2854,7249 h60
  text "Top Layer - Bottom Layer" at 3587.81,7249 h60
  text "Pad" at 5087.36,7249 h60
  text "(Mixed)" at 5677.2,7249 h60
  text "(Mixed)" at 6423,7249 h60
  text "6" at 658.6,7099 h60
  text "78.74mil (2.000mm)" at 1248.45,7099 h60
  text "PTH" at 2348.13,7099 h60
  text "Round" at 2854,7099 h60
  text "Top Layer - Bottom Layer" at 3587.81,7099 h60
  text "Pad" at 5087.36,7099 h60
  text "Rounded" at 5677.2,7099 h60
  text "c260h200m265" at 6423,7099 h60
  text "241 Total" at 658.6,6949 h60
  text "Slot definitions :" at 152.73,6804.03 h60
  text "Routed Path Length" at 1185.42,6804.03 h60
  text "= Calculated from tool start centre position to tool end centre position." at 2288.08,6804.03 h60
  text "Hole Length" at 1185.42,6704.05 h60
  text "= Routed Path Length + Tool Size = Slot length as defined in the PCB layout" at 1878.22,6704.05 h60

## Dimensions
0,6293 to 55.12,6237.88 on Dimensions
0,6293 to 55.12,6237.88 on Dimensions
55.12,3146.46 to 0,0 on Dimensions
2795.35,6293 to 2795.35,0 on Dimensions
0,0 to 2795.35,0 on Dimensions

## Text inside footprints (layer, text, board x,y; h text height)
J3: Top Overlay "Board Edge" at 2031.07,27.12 h40
U2: Top Overlay "PCB Edge" at 468.99,39.33 h40; Top Overlay "Board Cutout" at 453,370 h40